# Altium PCB OpenRex_V1I1_PCB.PcbDoc (part 12 of 12)
Units mm, origin at the board's own origin, x right, y up, seen from the top; angles counter-clockwise.
Board outline 70 x 95 mm, 10 copper layers (L1, L2, L3, L4 (PWR), L5 (PWR), L6 (PWR), L7 (PWR), L8, L9, L10), stack 1.632 mm thick; 1080 components, 708 nets, 3831 pads, 2373 vias.
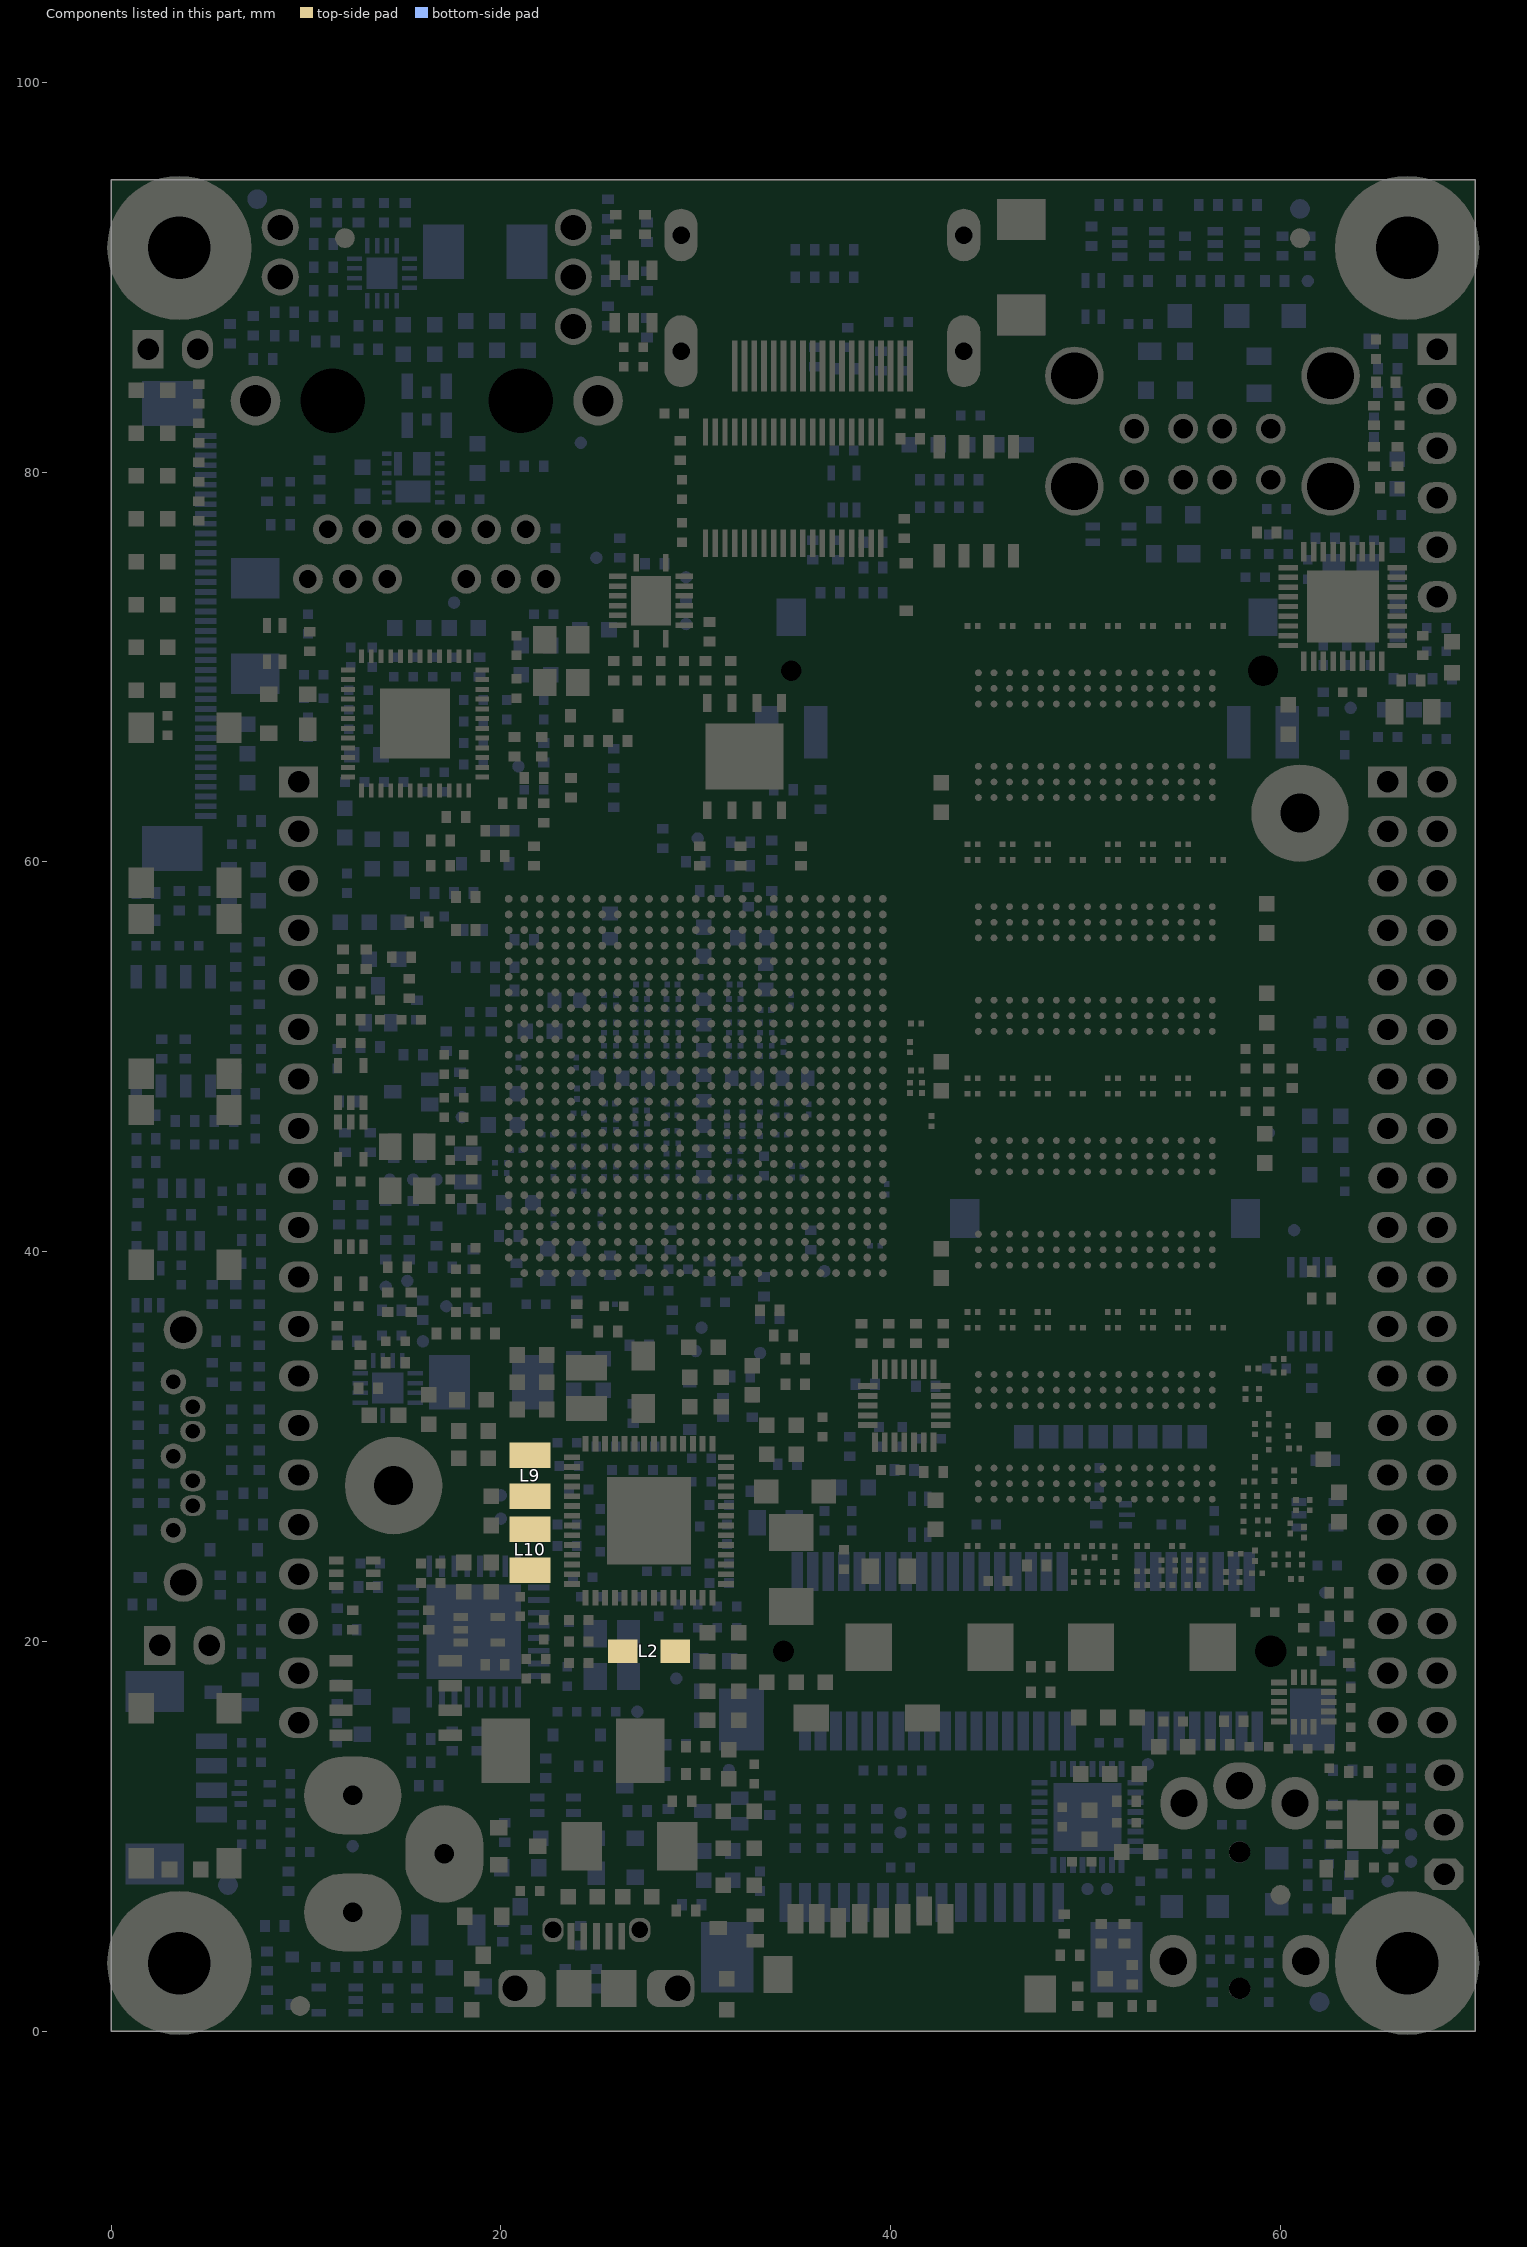
[diagram p20: the components of this part, seen from the top]

## Polygon pours and split planes (outlines as drawn) (continued)
GND on L10 "L10" (solid, remove dead copper, pour order 579): 23.6,30.5 24.1,30.5 24.3,30.3 24.5,30.3 25.2,30.3 25.2,29.7 25,29.5 24.7,29.2 24.25,28.75 23.7,28.75 23.7,29.4 23.6,29.5
+VIN_4V2 on L10 "L10" (solid, remove dead copper, pour order 578): 25.4,28.5 29.1,28.5 29.1,29 28.8,29 28.7,29.1 28.2,29.6 27.8,29.6 27.3,29.6 27.2,29.7 27.2,30.3 25.6,30.3 25.6,29.8 25.3,29.5 25.3,28.6
+3V3 on L10 "L10" (solid, remove dead copper, pour order 577): 38.2,29.8 38.2,29.2 37.9,29.2 37.8,29.1 37.8,27.5 36.9,27.5 36.9,29.8 38.2,29.8
+3V3_GYRO on L10 "L10" (solid, remove dead copper, pour order 576): 38.4,27.5 39.3,27.5 39.3,28 39.7,28.4 39.8,28.5 40.5,28.5 40.5,29.1 40.9,29.5 40.9,30.3 39.1,30.3 38.9,30.1 38.9,29.4 38.9,29.2 38.5,28.8 38.4,28.7
GND on L10 "L10" (solid, remove dead copper, pour order 575): 24.8,34.9 25.8,34.9 26.2,34.5 26.2,32.7 26,32.5 24.8,32.5
+1V375_SOC on L10 "L10" (solid, remove dead copper, pour order 574): 20.6,34.7 20.6,31.9 22.8,31.9 23.4,31.3 23.9,31.3 23.9,32.2 24.2,32.5 24.2,34.9 23.4,34.9 23.2,35.1 21,35.1 20.6,34.7
+VIN_4V2 on L10 "L10" (solid, remove dead copper, pour order 573): 15.4,32.3 14.9,31.8 14.9,31.6 14.7,31.6 14.4,31.6 14.3,31.5 14.3,30.8 14.4,30.7 15.3,30.7 16,31.4 16,32.3
PHASE_1V375 on L10 "L10" (solid, remove dead copper, pour order 572): 15.7,32.6 15.6,32.7 15.6,33.8 15.6,34 16.3,34.7 18.4,34.7 18.4,31.9 16.3,31.9 16.3,32.3 16,32.6 15.7,32.6 15.6,32.7
+VIN_5V on L10 "L10" (solid, remove dead copper, pour order 570): 19 vertices, not listed, extent 21.4,8.9 22.9,10.8
+3V3_MCU on L10 "L10" (solid, remove dead copper, pour order 569): 23.6,16.1 25.2,16.1 25.2,16.6 25,16.8 24.6,17.2 23.5,17.2 23.4,17.1 23.4,17 23.4,16.8 23.5,16.7 23.6,16.6
GND on L10 "L10" (solid, remove dead copper, pour order 568): 19.8,5.3 20.4,5.3 20.9,5.8 21.4,5.8 21.4,6.8 20.7,7.5 20.5,7.5 20,7 20,6.7 20,6.5 19.9,6.4 19.8,6.3 19.8,5.5
+V_INPUT on L10 "L10" (solid, remove dead copper, pour order 567): 16.3,4.4 16.3,6.5 16,6.8 15.4,6.8 15.1,6.5 15.1,4.4 16.3,4.4
GND on L10 "L10" (solid, remove dead copper, pour order 566): 21 vertices, not listed, extent 0.7,7.1 4.4,10.3
GND on L10 "L10" (solid, remove dead copper, pour order 565): 1.1,19.1 1.6,18.6 4,18.6 4.4,18.2 4.4,16.6 3.6,15.8 3.1,15.3 1.6,15.3 0.9,15.3 0.7,15.5 0.7,18.8 1,19.1
GND on L10 "L10" (solid, remove dead copper, pour order 564): 22 vertices, not listed, extent 0.4,59.2 5.2,62.4
SPLIT_R on L10 "L10" (solid, remove dead copper, pour order 563): 4.8,49.1 5.4,49.1 5.9,48.6 6.1,48.4 6.5,48.4 6.7,48.4 6.7,47.8 5.5,47.8 5.4,47.9 4.8,47.9 4.8,49.1
+3V3 on L10 "L10" (solid, remove dead copper, pour order 562): 7.2,58.4 8.2,58.4 8.5,58.1 8.5,57.7 7.7,56.9 7.5,56.9 7.2,57.2 7.1,57.3 7.1,58.4
+3V3_CSI1 on L10 "L10" (solid, remove dead copper, pour order 561): 4.8,63 4.8,62.2 5.3,62.2 5.4,62.1 5.6,61.9 5.6,59.3 5.6,57.6 6.5,57.6 6.5,61.3 6.2,61.6 6.2,62.2 6.2,62.4 5.6,63 4.8,63
GND on L10 "L10" (solid, remove dead copper, pour order 560): 6.9,61.2 7.5,61.2 8,60.7 8,59.1 7.5,58.6 7.1,58.6 7.1,59.8 7.1,60 7,60.1 6.9,60.2 6.9,61.2
GND on L10 "L10" (solid, remove dead copper, pour order 559): 28.9,39.4 28.9,37.7 28.3,37.7 28.3,38.3 27.8,38.8 27.8,39.3 27.9,39.4
GND on L10 "L10" (solid, remove dead copper, pour order 558): 19.6,42.9 20.5,42.9 20.5,42.2 20.8,41.9 20.9,41.8 20.9,41.6 20.8,41.5 19.9,41.5 19.6,41.8 19.6,42 19.6,42.9
+NVCC_CSI on L10 "L10" (solid, remove dead copper, pour order 557): 27 vertices, not listed, extent 29.5,39.2 32.7,43.5
+HDMI_VPH on L10 "L10" (solid, remove dead copper, pour order 556): 27 vertices, not listed, extent 28.7,39.2 31,44
+HDMI_VP on L10 "L10" (solid, remove dead copper, pour order 555): 29 vertices, not listed, extent 27.9,40.8 29,44
+NVCC_MIPI on L10 "L10" (solid, remove dead copper, pour order 554): 27.3,44 27.3,43.7 26.9,43.3 26.5,42.9 26.5,41.5 26.5,40.2 26.9,39.8 27.5,39.8 27.8,40.1 27.8,40.8 27.8,42.4 27.7,42.5 27.7,44
+2V5 on L10 "L10" (solid, remove dead copper, pour order 553): 35.6,40.4 36.8,40.4 37.7,39.5 37.7,39 37.6,38.9 37.4,38.7 36.5,38.7 35.6,39.6 35.6,40.4
GND on L10 "L10" (solid, remove dead copper, pour order 511): 45.4,94 48.2,94 48.6,93.6 48.6,92.3 48.2,91.9 45.4,91.9
PHASE_3V3_HDR on L10 "L10" (solid, remove dead copper, pour order 514): 15.35,89.85 18.1,89.85 18.1,92.7 16,92.7 15.4,92.1 15.3,92 15.3,90 15.3,89.9
+VIN_4V2 on L10 "L10" (solid, remove dead copper, pour order 515): 17 vertices, not listed, extent 14.05,86.8 17.6,89.55
GND on L10 "L10" (solid, remove dead copper, pour order 516): 14.6,86.5 15.4,86.5 15.6,86.3 15.8,86.3 16,86.3 16.2,86.5 17,86.5 17,85.6 16.7,85.3 15,85.3 14.9,85.3 14.6,85.6
GND on L10 "L10" (solid, remove dead copper, pour order 517): 19 vertices, not listed, extent 17.4,85.3 22.3,87
+3V3_HDR on L10 "L10" (solid, remove dead copper, pour order 518): 22 vertices, not listed, extent 17.8,87.3 22.4,92.7
GND on L10 "L10" (solid, remove dead copper, pour order 519): 25 vertices, not listed, extent 0.5,80.9 5.3,85.3
GND on L10 "L10" (solid, remove dead copper, pour order 520): 12,80.7 12,80.3 12.5,79.8 13.3,79.8 13.5,80 13.5,81.1 13.2,81.1 13.1,81.1 12.9,80.9 12.8,80.8 12.7,80.8 12.2,80.8 12,80.6
+3V3 on L10 "L10" (solid, remove dead copper, pour order 521): 11.5,80.8 11.6,80.7 11.6,80.5 11.5,80.4 11.4,80.3 10.5,80.3 10,80.3 9.8,80.5 9.8,80.7 10,80.9 10.3,80.9 11.4,80.9 11.5,80.8
+VIN_4V2 on L10 "L10" (solid, remove dead copper, pour order 522): 10.1,79.1 10.3,78.9 10.4,78.9 11.1,78.9 11.3,79.1 11.5,79.1 11.6,79 11.6,78.8 11.1,78.3 10.3,78.3 9.8,78.8 9.8,79 9.9,79.1
+VIN_ETH on L10 "L10" (solid, remove dead copper, pour order 523): 10.4,79.9 11.9,79.9 12.6,79.2 13.3,79.2 14,78.5 14,78.4 13.9,78.3 12.5,78.3 11.5,79.3 10.4,79.3
SW_EP on L10 "L10" (solid, remove dead copper, pour order 524): 13.9,81 13.9,81.1 15,81.1 15,79.8 14.5,79.8 14.4,79.7 14.4,79.4 14.4,79.3 13.9,79.3
+1V2_REG on L10 "L10" (solid, remove dead copper, pour order 525): 30 vertices, not listed, extent 15.5,78.3 20.5,81.1
+1V2_ETH on L10 "L10" (solid, remove dead copper, pour order 526): 20.9,80 21.5,80 21.5,80.6 21.8,80.9 21.8,81.1 21.7,81.2 20.7,81.2 20.6,81.1 20.6,80.9 20.9,80.6
+1V2_PMIC on L10 "L10" (solid, remove dead copper, pour order 527): 22,80 22,81.2 22.8,82 24.2,82 24.4,81.8 24.5,81.7 24.5,81.3 23.2,80
GND on L10 "L10" (solid, remove dead copper, pour order 528): 22.1,71.5 23.4,71.5 24.3,70.6 24.3,70.2 23.3,69.2 22.1,69.2
+1V2_ETH_AVDDL_PLL on L10 "L10" (solid, remove dead copper, pour order 529): 30 vertices, not listed, extent 18.8,66.9 22.5,70
GND on L10 "L10" (solid, remove dead copper, pour order 530): 9.8,67.1 10.4,67.1 10.9,67.6 10.9,67.8 10.7,68 10.3,68 10.2,68.1 10.2,68.7 9.6,68.7 9.6,67.3
+1V2_ETH_DVDDL on L10 "L10" (solid, remove dead copper, pour order 531): 44 vertices, not listed, extent 11.3,62.3 16.4,67.5
GND on L10 "L10" (solid, remove dead copper, pour order 532): 6.2,73.5 8.7,73.5 8.7,75.4 9.2,75.9 9.2,76.1 9.1,76.2 8,76.2 7.4,76.2 6.8,75.6 6.2,75.6
+5V_HDR_J1 on L10 "L10" (solid, remove dead copper, pour order 533): 22 vertices, not listed, extent 6.2,63.3 10.6,70.7
+5V on L10 "L10" (solid, remove dead copper, pour order 534): 7.3,68.1 7.5,68.1 8,67.6 8,67.2 7.4,66.6 6.9,66.6 6.6,66.6 6.6,67.4
+VIN_5V on L10 "L10" (solid, remove dead copper, pour order 535): 7.4,63.6 7.4,64.5 6.4,64.5 6,64.9 5.7,64.9 5.7,63.8 5.9,63.6
+3V3 on L10 "L10" (solid, remove dead copper, pour order 536): 14.3,56.5 15.2,56.5 15.2,57.9 13.8,57.9 13.8,57.6 13.9,57.5 14,57.4 14.2,57.4 14.3,57.3
+3V3_HDR on L10 "L10" (solid, remove dead copper, pour order 537): 11.1,55.9 12.1,55.9 12.2,56 12.2,57.3 11.3,57.3 11.1,57.1 11.1,55.9
+3V3_HDR_J1 on L10 "L10" (solid, remove dead copper, pour order 538): 19 vertices, not listed, extent 9.1,48.3 13.7,57.3
GND on L10 "L10" (solid, remove dead copper, pour order 539): 14.3,55.4 14.8,55.4 15.2,55.8 15.6,55.8 15.6,54.7 15,54.1 14.4,54.1 14.3,54.2 14.3,55.4
GND on L10 "L10" (solid, remove dead copper, pour order 540): 21.7,51.7 21.7,50.9 20.7,50.9 20.2,50.4 20.1,50.3 20,50.3 19.8,50.5 19.8,50.7 20.2,51.1 20.8,51.7 21.7,51.7
+1V375_CORE on L10 "Power plane" (solid, pour order 411): 21 vertices, not listed, extent 27.8,44.8 33,45.5
GND on L10 "Power plane" (solid, pour order 414): 23 vertices, not listed, extent 26.7,44.7 29.7,46.3
+1V2_VDD_ARM_CAP on L10 "Power plane" (solid, pour order 421): 29 vertices, not listed, extent 26.2,46.05 31.8,46.8
GND on L10 "Power plane" (solid, pour order 425): 23 vertices, not listed, extent 25.7,46.6 28.9,48.2
GND on L10 "Power plane" (solid, pour order 433): 27 vertices, not listed, extent 28.5,47.2 32.2,49.4
GND on L10 "Power plane" (solid, pour order 437): 31.2,47.3 32.6,47.3 33.5,47.3 33.5,47.2 33.5,46.3 32.9,46.3 32.1,46.3 32.1,46.7 31.9,46.9 31.6,46.9 31.4,46.9 31.2,47.1
+1V1_VDDSOC_CAP on L10 "Power plane" (solid, pour order 442): 19 vertices, not listed, extent 32.1,47.5 33.5,50.2
+1V375_CORE on L10 "Power plane" (solid, pour order 446): 23 vertices, not listed, extent 25.7,48.5 29.8,50.2
+1V2_VDD_ARM_CAP on L10 "Power plane" (solid, pour order 450): 26.2,48.1 26.2,48.2 26.3,48.3 26.4,48.3 27,48.3 27.1,48.4 27.1,49.3 27.3,49.3 27.9,49.3 27.9,48.5 28.1,48.3 28.1,48 28,47.9 27.7,47.6 26.7,47.6
GND on L10 "Power plane" (solid, pour order 453): 31 vertices, not listed, extent 24.7,50.3 29.8,51.4
GND on L10 "Power plane" (solid, pour order 455): 17 vertices, not listed, extent 31.1,50.3 35.4,50.9
+1V375_SOC on L10 "Power plane" (solid, pour order 456): 62 vertices, not listed, extent 23.7,50.6 33.5,53.3
+VDDPU on L10 "Power plane" (solid, pour order 458): 30 vertices, not listed, extent 25.7,51.4 30.8,52.8
GND on L10 "Power plane" (solid, pour order 459): 40 vertices, not listed, extent 24.6,52.6 30.8,53.9
GND on L10 "Power plane" (solid, pour order 462): 26 vertices, not listed, extent 34.5,45.8 36.1,49.3
GND on L10 "L10" (solid, remove dead copper, pour order 541): 25.3,48.5 25.3,49.3 24.3,49.3 24,49.6 23.7,49.6 23.7,48.2 24.1,48.2 24.2,48.2 24.5,48.5 25.3,48.5
+3V3 on L10 "L10" (solid, remove dead copper, pour order 542): 25 vertices, not listed, extent 22.3,49.6 25.5,51.9
+3V3 on L10 "L10" (solid, remove dead copper, pour order 543): 27 vertices, not listed, extent 27.3,53.55 30.8,55.55
GND on L10 "L10" (solid, remove dead copper, pour order 544): 32.95,53.55 32.95,54.2 33.15,54.4 34,54.4 34.05,54.45 34.05,56.5 33.25,56.5 33.25,55.75 32.9,55.4 32.45,54.95 32.45,53.9 32.45,53.75 32.65,53.55
+1V5_DDR on L10 "L10" (solid, remove dead copper, pour order 545): 21 vertices, not listed, extent 31.05,52.25 34,53.8
GND on L10 "L10" (solid, remove dead copper, pour order 546): 27 vertices, not listed, extent 31.1,51.6 35.1,53.3
+1V5_DDR on L10 "L10" (solid, remove dead copper, pour order 547): 34.75,52.8 34.25,52.3 34.25,51.9 34.25,51.6 34.05,51.4 33.75,51.4 33.75,51.05 34.45,51.05 34.6,51.2 34.9,51.5 34.9,52 34.9,52.3 35.05,52.45 35.05,52.8
+LVDS_2V5 on L10 "L10" (solid, remove dead copper, pour order 548): 25 vertices, not listed, extent 33.2,40.8 36.2,44.2
+1V5_DDR on L10 "L10" (solid, remove dead copper, pour order 549): 28 vertices, not listed, extent 33.7,44.2 35.1,50.4
GND on L10 "Power plane" (solid, pour order 409): 46 vertices, not listed, extent 25.7,42.6 33,45
GND on L10 "L10" (solid, remove dead copper, pour order 550): 25 vertices, not listed, extent 24.1,44.2 25.5,46.4
GND on L10 "L10" (solid, remove dead copper, pour order 551): 23.9,44 23.9,42.9 23.3,42.9 22.5,43.7 22.5,44 22.9,44 23.1,44.2 23.3,44.2 23.4,44.1 23.5,44 23.9,44
+1V1_NVCC_PLL_OUT on L10 "L10" (solid, remove dead copper, pour order 552): 21 vertices, not listed, extent 20.9,42.1 23.4,45
GND on L10 "L10" (solid, remove dead copper, pour order 397): 24.7,13.9 25.2,13.9 25.5,14.2 26.8,14.2 26.8,13.5 26,13.5 25.8,13.3 25.1,12.6 24.6,12.6 24.5,12.6 24.4,12.7 24.4,12.9 24.4,13 24.7,13.3
GND on L10 "L10" (solid, remove dead copper, pour order 400): 26.4,10.3 26.4,9.5 26.7,9.2 27.2,8.7 27.7,8.7 27.8,8.8 27.8,10.3 27.6,10.5 26.6,10.5 26.4,10.3
GND on L10 "L10" (solid, remove dead copper, pour order 319): 48.5,24.6 49.5,24.6 49.6,24.5 49.6,24.2 49.2,23.8 49.1,23.7 49.1,23.5 48.5,23.5
GND on L2 (split plane): 69.898,0.102 0.102,0.102 0.102,94.898 69.898,94.898
GND on L9 (split plane): 69.898,0.102 0.102,0.102 0.102,94.898 69.898,94.898

## Other copper
L10:
  rectangle net PWM2_OUT_R: 61.7,50.3 62.35,50.95
  region net UART4_TXD: 63.5,50.95 62.85,50.95 62.85,50.3 63.5,50.3
  region net UART4_TXD_R: 62.85,52.1 62.85,51.45 63.5,51.45 63.5,52.1
  region net GPIO_OR_PWM_2: 61.7,52.1 61.7,51.45 62.35,51.45 62.35,52.1
  region: 1344 vertices and 0 holes, not listed, extent 31.797,93.426 33.878,94.403
  region: 1381 vertices and 0 holes, not listed, extent 32.34,91.702 33.939,93.239
  region: 2099 vertices and 0 holes, not listed, extent 30.813,91.665 32.707,94.4

## Silkscreen, mask and mechanical layers (free items; w line width, h text height)
Top Overlay:
  text ".VersionRevision" at 52.7,77.2 h2.5 r180
  text "5" at 4.7,75.9 h2.2 r270
  text ".Project" at 57,74.8 h3.35 r180
  text "6" at 4.7,73.7 h2.2 r270
  text "7" at 4.7,71.5 h2.2 r270
  text "8" at 4.7,69.3 h2.2 r270
  text "+" at 3.1,57.8 h3
  text "(c) 2016" at 61.8,52 h2.2 r90
  text "-" at 3,49.6 h3.5 r270
  text "FEDEVEL Academy" at 63.5,41 h2.2 r90
  text "H" at 3,39.9 h2.5 r270
  text "R" at 3,17.5 h2.5 r270
Bottom Overlay:
  lines w0.254: 26.644,77.999 26.644,80.499 ; 29.644,77.999 29.644,80.499 ; 32.644,77.999 32.644,80.499 ; 23.644,77.999 35.644,77.999 35.644,80.499 23.644,80.499 23.644,77.999
  text "MODBOX" at 35.6,81.5 h2.3
  text "D" at 25.944,78.499 h2.5
  text "C" at 28.944,78.499 h2.5
  text "B" at 31.944,78.499 h2.5
  text "A" at 34.944,78.499 h2.5
  text "Learn Schematic" at 55.8,68 h2.5
  text "and PCB Design" at 55.6,65.4 h2.5
  text "ONLINE at" at 52.4,62.8 h2.5
  text "FEDEVEL Academy" at 57.3,60.2 h2.5
  text "Do you want to learn how to" at 59.8,55 h2
  text "design boards like this?" at 58.2,52.7 h2
  text "Go to: fedevel.com/academy" at 60.2,50.4 h2
Bottom Paste:
  rectangle: 61.7,51.45 62.35,52.1
  rectangle: 62.85,51.45 63.5,52.1
  rectangle: 62.85,50.3 63.5,50.95
  rectangle: 61.7,50.3 62.35,50.95
Bottom Solder:
  drawing of 7 lines, arcs and shapes, not listed
Manufacturing Notes:
  circle w1: c176.75,149.25 r0.25
  circle w1: c176.75,108.25 r0.25
  circle w1: c260.75,108.25 r0.25
  circle w1: c260.75,149.25 r0.25
  lines w0.2: 142.5,102.5 178.75,102.5 ; 142.5,105 178.75,105 ; 142.5,152.5 178.75,152.5 ; 142.5,155 178.75,155 ; 144,101.5 145,102.5 146,101.5 ; 144,106 145,105 146,106 ; 144,151.5 145,152.5 146,151.5 ; 144,156 145,155 146,156 ; 145,95 145,162.5 ; 163.75,128.75 165,128.75 ; 175,108.75 176.25,108.75 ; 175,148.75 176.25,148.75 ; 176.25,110 176.25,108.75 ; 176.25,147.5 176.25,148.75 ; 180,108.75 180,110 ; 180,152.5 180,164 ; 181,161.5 180,162.5 ; 181,163.5 180,162.5 ; 181.25,110 180,110 ; 197.5,91 197.5,92.5 ; 213.75,102.5 213.75,103.75 ; 213.75,110 215,110 ; 213.75,155 213.75,153.75 ; 214,161.5 215,162.5 ; 214,163.5 215,162.5 ; 215,102.5 227.5,102.5 ; 215,103.75 213.75,103.75 ; 215,105 227.5,105 ; 215,108.75 215,110 ; 215,153.75 213.75,153.75 ; 215,155 227.5,155 ; 215,164 215,152.5 227.5,152.5 ; 218.75,93.75 218.75,98.75 ; 218.75,163.75 218.75,158.75 ; 222.5,103.75 223.75,103.75 ; 222.5,108.75 222.5,110 ; 222.5,152.5 222.5,164 ; 222.5,153.75 223.75,153.75 ; 223.5,161.5 222.5,162.5 ; 223.5,163.5 222.5,162.5 ; 223.75,102.5 223.75,103.75 ; 223.75,110 222.5,110 ; 223.75,155 223.75,153.75 ; 240,91 240,92.5 ; 256.25,110 257.5,110 ; 256.5,161.5 257.5,162.5 ; 256.5,163.5 257.5,162.5 ; 257.5,108.75 257.5,110 ; 257.5,152.5 257.5,164 ; 261.25,110 261.25,108.75 ; 261.25,147.5 261.25,148.75 ; 262.5,108.75 261.25,108.75 ; 262.5,148.75 261.25,148.75 ; 282.5,128.75 281.25,128.75 ; 165,128.75 167,126.75 ; 165,128.75 167,130.75 167,139.5 176.25,148.75 ; 167,126.75 167,118 176.25,108.75 ; 167,126.75 167,126.75 ; 180,110 197.5,92.5 ; 180,162.5 215,162.5 ; 197.5,92.5 215,110 ; 213.75,103.75 218.75,98.75 ; 213.75,153.75 218.75,158.75 ; 218.75,98.75 223.75,103.75 ; 218.75,158.75 223.75,153.75 ; 222.5,110 240,92.5 ; 222.5,162.5 257.5,162.5 ; 240,92.5 257.5,110 ; 261.25,108.75 281.25,128.75 ; 261.25,148.75 281.25,128.75
  lines w0.254: -6.5,-82 86,-82 ; -6.5,-81.925 -6.5,-71.925 ; -6.5,-62 86,-62 ; 33.5,-72 33.5,-62 ; 68.5,-62 68.5,-54.5 ; 86,-81.925 86,-71.925 ; -6.5,-72 -6.5,-54.5 86,-54.5 86,-72 -6.5,-72
  lines w0.4: 142.524,54.2 291.976,54.2 ; 142.524,61.16 291.976,61.16 ; 291,70.5 143.25,70.5 ccw(c143.25,68.25) 141,68.25 141,-34.75 ccw(c143.25,-34.75) 143.25,-37 291.25,-37 ccw(c291.25,-34.75) 293.5,-34.75 293.5,68.25 ccw(c291.25,68.25) 291.25,70.5
  lines w0.5: 180,100 180,102.5 ; 180,105 180,152.5 ; 180,155 180,157.5 ; 215,100 215,102.5 ; 215,105 215,152.5 ; 215,155 215,157.5 ; 216.096,102.5 ccw(c216.096,103.75) 216.096,105 ; 216.096,152.5 ccw(c216.096,153.75) 216.096,155 ; 216.25,102.5 178.75,102.5 cw(c178.75,103.75) 178.75,105 216.25,105 ; 216.25,152.5 178.75,152.5 cw(c178.75,153.75) 178.75,155 216.25,155 ; 221.25,102.5 258.75,102.5 ccw(c258.75,103.75) 258.75,105 221.25,105 ; 221.25,152.5 258.75,152.5 ccw(c258.75,153.75) 258.75,155 221.25,155 ; 221.404,102.5 cw(c221.404,103.75) 221.404,105 ; 221.404,152.5 cw(c221.404,153.75) 221.404,155 ; 222.5,100 222.5,102.5 ; 222.5,105 222.5,152.5 ; 222.5,155 222.5,157.5 ; 257.5,100 257.5,102.5 ; 257.5,105 257.5,152.5 ; 257.5,155 257.5,157.5 ; 263.75,100 173.75,100 173.75,157.5 263.75,157.5 263.75,100.154
  text "Board info" at 141,258 h1.52
  text "Minimum Track: 100um" at 141,255.5 h1.52
  text "Minimum Gap: 100um" at 141,253 h1.52
  text "Minimum Through Hole VIA: 0.45mm (pad) / 0.2mm (drill). Drilling: L1-L10" at 141,250.5 h1.52
  text "1. REMOVE ALL NON-FUNCTIONAL INNER LAYER PADS." at 141,245.5 h1.52
  text "2. THIS BOARD CONTAINS IMPEDANCE CONTROLLED TRACKS, TRACK AND GAP SIZES ARE AS FOLLOWS:" at 141,240.5 h1.52
  text "TYPE;" at 146,235.5 h1.52
  text "Impedance;" at 158.5,235.5 h1.52
  text "Layer (Reference);" at 181,235.5 h1.52
  text "Width (um);" at 216,235.5 h1.52
  text "Gap (um);" at 236,235.5 h1.52
  text "DIFF;" at 146,230.5 h1.52
  text "90ohm;" at 158.5,230.5 h1.52
  text "L1(L2), L10(L9);" at 181,230.5 h1.52
  text "114" at 216,230.5 h1.52
  text "160" at 236,230.5 h1.52
  text "DIFF;" at 146,228 h1.52
  text "90ohm;" at 158.5,228 h1.52
  text "L3(L2,L4), L8(L9,L7);" at 181,228 h1.52
  text "130" at 216,228 h1.52
  text "190" at 236,228 h1.52
  text "DIFF;" at 146,223 h1.52
  text "100ohm;" at 158.5,223 h1.52
  text "L1(L2), L10(L9);" at 181,223 h1.52
  text "100" at 216,223 h1.52
  text "220" at 236,223 h1.52
  text "DIFF;" at 146,220.5 h1.52
  text "100ohm;" at 158.5,220.5 h1.52
  text "L3(L2,L4), L8(L9,L7);" at 181,220.5 h1.52
  text "110" at 216,220.5 h1.52
  text "210" at 236,220.5 h1.52
  text "SE;" at 146,215.5 h1.52
  text "50ohm;" at 158.5,215.5 h1.52
  text "L1(L2), L10(L9);" at 181,215.5 h1.52
  text "114" at 216,215.5 h1.52
  text "SE;" at 146,213 h1.52
  text "50ohm;" at 158.5,213 h1.52
  text "L3(L2,L4), L8(L9,L7);" at 181,213 h1.52
  text "120" at 216,213 h1.52
  text "3. FINISHED PANEL THICKNESS IS NOT CRITICAL: TO BE APPROXIMATELY 1.6mm" at 141,208 h1.52
  text "4. BOARD FINISH: IMMERSION Au/ELECTROLESS Ni; 0.05-0.12 um GOLD; 3-6um NICKEL" at 141,203 h1.52
  text "5. SOLDER RESIST: APPLY TO BOTH SIDES COLOUR - NAVY BLUE" at 141,198 h1.52
  text "6. COMPONENT IDENT: COLOUR TO BE WHITE" at 141,193 h1.52
  text "7. PANELIZE THE BOARD (2PCS PER PANEL). PLACE FIDUCIALS ON THE PANEL STRIPS AS FOLLOWS:" at 141,188 h1.52
  text "- FIDUCIAL DIAMTER 1-1.5MM, SOLDER MASK OPENING AT LEAST 1MM GREATER THAN FIDUCIAL" at 146,185.5 h1.52
  text "- MINIMUM 4MM DISTANCE FROM THE PANEL EDGE" at 146,183 h1.52
  text "- 3 FIDUCIALS SHOULD LIE ON TWO LINES THAT INTERSECT AT A RIGHT ANGLE" at 146,180.5 h1.52
  text "- PLACE ONE FIDUCIAL INTO EACH PANEL CORNER (FOUR ON THE TOP AND FOUR ON THE BOTTOM LAYER)" at 146,178 h1.52
  text "PANEL DRAWING (NOT IN SCALE):" at 145.254,172.754 h1.52
  text "- NOT SPECIFIED DIMENSIONS ARE NOT CRITICAL. CAN BE CHOSEN BY PCB MANUFACTURER" at 145.254,170.254 h1.52
  text "CUT-OUT" at 214.004,165.254 h1.52
  text "70mm" at 194.75,163.75 h1.52
  text "70mm" at 237.25,163.75 h1.52
  text "5mm" at 143.75,157.5 h1.52 r90
  text "Files" at -4,150.5 h1.52
  text "*.GTO - Top Overlay" at -4,148 h1.52
  text "*.GTP - Top Paste" at -4,145.5 h1.52
  text "*.GTS - Top Solder" at -4,143 h1.52
  text "*.GTL - L1 (Positive)" at -4,140.5 h1.52
  text "*.GP1 - L2 (Negative)" at -4,138 h1.52
  text "*.G1 - L3 (Positive)" at -4,135.5 h1.52
  text "*.G2 - L4 (PWR) (Positive)" at -4,133 h1.52
  text "*.G3 - L5 (PWR) (Positive)" at -4,130.5 h1.52
  text "FIDUCIALS" at 148.354,128.404 h1.52
  text "*.G4 - L6 (PWR) (Positive)" at -4,128 h1.52
  text "FIDUCIALS" at 285.354,127.654 h1.52
  text "PCB" at 190,127.5 h5.08
  text "PCB" at 232.5,127.5 h5.08
  text "95mm" at 143.75,126.25 h1.52 r90
  text "*.G5 - L7 (PWR) (Positive)" at -4,125.5 h1.52
  text "*.G6 - L8 (Positive)" at -4,123 h1.52
  text "*.GP2 - L9 (Negative)" at -4,120.5 h1.52
  text "*.GBL - L10 (Positive)" at -4,118 h1.52
  text "*.GBS - Bottom Solder" at -4,115.5 h1.52
  text "*.GBP - Bottom Paste" at -4,113 h1.52
  text "*.GBO - Bottom Overlay" at -4,110.5 h1.52
  text "*.GM3 - Manufacturing Notes" at -4,108 h1.52
  text "*.GM4 - License" at -4,105.5 h1.52
  text "*.GM6 - Mechanical Drawing" at -4,103 h1.52
  text "*.GM28 - Board Outline" at -4,100.5 h1.52
  text "5mm" at 143.75,96.25 h1.52 r90
  text "CUT-OUT" at 213.75,91.25 h1.52
  text "V-CUT" at 194.104,87.654 h1.52
  text "V-CUT" at 236.604,87.654 h1.52
  text "Layer Stack Up Detail for: OpenRex V1I1_PCB.PcbDoc" at 142.524,64.75 h1.6
  text "Layer" at 142.524,58.56 h1.6
  text "Gerber" at 187.629,58.56 h1.6
  text "Copper" at 210.818,58.56 h1.6
  text "Dielectric" at 234.119,58.56 h1.6
  text "Dielectric" at 261.619,58.56 h1.6
  text "Name" at 142.524,55.36 h1.6
  text "Document" at 187.629,55.36 h1.6
  text "Thickness" at 210.818,55.36 h1.6
  text "Height" at 234.119,55.36 h1.6
  text "Constant" at 261.619,55.36 h1.6
  text "Top Solder Mask" at 142.524,50.193 h2.25
  text "(.GTS)" at 187.629,50.193 h2.25
  text "43um" at 212.629,42.693 h2.25
  text "L1" at 142.524,42.578 h2.25
  text "(.GTL)" at 187.629,42.578 h2.25
  text "74um" at 235.129,38.943 h2.25
  text "3.95" at 262.629,38.943 h2.25
  text "18um" at 212.629,35.193 h2.25
  text "L2" at 142.524,34.963 h2.25
  text "(.GP1)" at 187.629,34.963 h2.25
  text "102um" at 235.129,31.443 h2.25
  text "4.12" at 262.629,31.443 h2.25
  text "18um" at 212.629,27.693 h2.25
  text "L3" at 142.524,27.348 h2.25
  text "(.G1)" at 187.629,27.348 h2.25
  text "282um" at 235.129,23.943 h2.25
  text "4.06" at 262.629,23.943 h2.25
  text "18um" at 212.629,20.193 h2.25
  text "L4 (PWR)" at 142.524,19.733 h2.25
  text "(.G2)" at 187.629,19.733 h2.25
  text "102um" at 235.129,16.443 h2.25
  text "4.12" at 262.629,16.443 h2.25
  text "18um" at 212.629,12.693 h2.25
  text "L5 (PWR)" at 142.524,12.233 h2.25
  text "(.G3)" at 187.629,12.233 h2.25
  text "282um" at 235.129,8.943 h2.25
  text "4.06" at 262.629,8.943 h2.25
  text "18um" at 212.629,5.193 h2.25
  text "L6 (PWR)" at 142.524,4.733 h2.25
  text "(.G4)" at 187.629,4.733 h2.25
  text "102um" at 235.129,1.443 h2.25
  text "4.12" at 262.629,1.443 h2.25
  text "18um" at 212.629,-2.307 h2.25
  text "L7 (PWR)" at 142.524,-2.652 h2.25
  text "(.G5)" at 187.629,-2.652 h2.25
  text "282um" at 235.129,-6.057 h2.25
  text "4.06" at 262.629,-6.057 h2.25
  text "18um" at 212.629,-9.807 h2.25
  text "L8" at 142.524,-10.267 h2.25
  text "(.G6)" at 187.629,-10.267 h2.25
  text "102um" at 235.129,-13.557 h2.25
  text "4.12" at 262.629,-13.557 h2.25
  text "18um" at 212.629,-17.307 h2.25
  text "L9" at 142.524,-17.882 h2.25
  text "(.GP2)" at 187.629,-17.882 h2.25
  text "74um" at 235.129,-21.057 h2.25
  text "3.95" at 262.629,-21.057 h2.25
  text "43um" at 212.9,-24.6 h2.25
  text "L10" at 142.524,-25.497 h2.25
  text "(.GBL)" at 187.629,-25.497 h2.25
  text "Bottom Solder Mask" at 142.524,-33.112 h2.25
  text "(.GBS)" at 187.629,-33.112 h2.25
  text "OpenRex" at -3.5,-59.5 h3
  text ".VersionRevision" at 71,-59.5 h3
  text "Copyright 2016" at -1.5,-67 h1.52
  text "Designed by FEDEVEL" at 38.5,-67 h1.52
  text "FEDEVEL" at -1.5,-69.5 h1.52
  text "www.fedevel.com" at 38.5,-69.5 h1.52
  text "Contact:" at -1.5,-77 h1.52
  text "robert.feranec@fedevel.com" at 13.5,-77 h1.52
License:
  text "LICENSE" at -9,280.5 h1.52
  text "OpenRex is a registered trademark of FEDEVEL." at -9,275.5 h1.52
  text "This project is developed under Creative Commons Attribution 4.0 International license." at -9,270.5 h1.52
  text "There is one exception:" at -9,268 h1.52
  text "Using this project (in whole or in part) or its modifications for any commercial" at -9,263 h1.52
  text "educational activities (e.g. paid courses, trainings, videos, ....)  without express" at -9,260.5 h1.52
  text "written permission of FEDEVEL is prohibited. Universities can use this project" at -9,258 h1.52
  text "with no limitations." at -9,255.5 h1.52
  text "Why this exception?" at -9,250.5 h1.52
  text "The income from FEDEVEL courses covers development of open source boards like this." at -9,248 h1.52
  text "Creative Commons Attribution 4.0 International license" at -9,243 h1.52
  text "ORIGINAL AUTHOR: FEDEVEL 2016" at -9,238 h1.52
  text "WEBSITE: http://www.iMX6Rex.com" at -9,235.5 h1.52
  text "This is a human-readable summary of (and not a substitute for) the Legal Code" at -9,230.5 h1.52
  text "(read full license at: http://creativecommons.org/licenses/by/4.0/legalcode)." at -9,228 h1.52
  text "You are free:" at -9,223 h1.52
  text "Share - copy and redistribute the material in any medium or format" at -9,220.5 h1.52
  text "Adapt - remix, transform, and build upon the material for any purpose, even commercially." at -9,218 h1.52
  text "The licensor cannot revoke these freedoms as long as you follow the license terms." at -9,213 h1.52
  text "Under the following conditions:" at -9,208 h1.52
  text "Attribution - You must give appropriate credit, provide a link to the license," at -9,205.5 h1.52
  text "and indicate if changes were made. You may do so in any reasonable manner," at -9,203 h1.52
  text "but not in any way that suggests the licensor endorses you or your use." at -9,200.5 h1.52
  text "No additional restrictions - You may not apply legal terms or technological measures" at -9,198 h1.52
  text "that legally restrict others from doing anything the license permits." at -9,195.5 h1.52
  text "Notices:" at -9,190.5 h1.52
  text "You do not have to comply with the license for elements of the material in the public" at -9,188 h1.52
  text "domain or where your use is permitted by an applicable exception or limitation." at -9,185.5 h1.52
  text "No warranties are given. The license may not give you all of the permissions" at -9,180.5 h1.52
  text "necessary for your intended use. For example, other rights such as publicity, privacy," at -9,178 h1.52
  text "or moral rights may limit how you use the material." at -9,175.5 h1.52
Mechanical Drawing:
  circle w2.8: c11.374,83.657 r0.25
  circle w2.8: c21.026,83.657 r0.25
  circle w0.6: c57.9,2.2 r0.25
  circle w0.6: c57.9,9.2 r0.25
  circle w0.6: c34.5,19.5 r0.25
  circle w0.8: c59.5,19.5 r0.4
  circle w0.8: c59.1,69.8 r0.375
  circle w0.6: c34.9,69.8 r0.225
  circle w0.6: c61,62.5 r1
  circle w1: c66.5,91.5 r1.6
  circle w0.6: c14.5,28 r1
  circle w1: c3.5,91.5 r1.6
  circle w1: c3.5,3.5 r1.6
  circle w1: c66.5,3.5 r1.6
  lines w0.254: 3.3,12.6 4.3,12.6 ; 3.3,43.3 4.3,43.3 ; 3.3,53.1 4.3,53.1 ; 3.3,62.9 4.3,62.9 ; 3.8,12.1 3.8,13.1 ; 3.8,42.8 3.8,43.8 ; 3.8,52.6 3.8,53.6 ; 3.8,62.4 3.8,63.4 ; 4.4,72.1 4.85,72.1 ; 4.6,13 5.15,13 ; 16.2,76.353 16.2,77.684 ; 36.5,83.5 36.5,84.07 ; 56,79 56,80.1
  lines w1: 0,0 70,0 70,95 0,95 0,0 ; 11.5,23 11.5,72 63.5,72 63.5,23 11.5,23
  text "Mechanical Drawing" at 6.5,165.5 h3.5
  text "of OpenRex" at 11.5,155.5 h3.5
  text ".VersionRevision" at 49,155.5 h3.5
  text "Suggested heatsink dimensions" at 25,74 h1.5
  text "(Scale 1:1)" at 27.5,-57.5 h1.52
Board Outline:
  the board outline again, w0.2
ASM Top:
  lines w0.01: 106.9,50 106.9,50.05
  lines w0.2: -22,32.5 -7,32.5 ; -19.5,32.5 -19.5,37.5 -16.5,37.5 -16.5,32.5 ; -18.5,32.5 -18.5,28.5 -17.5,28.5 -17.5,32.5
  text "Assembly TOP of OpenRex" at 16,102 h1.52
  text ".VersionRevision" at 52.3,102 h1.52
  text ".VariantName" at 27.5,98 h1.52
  text "IMPORTANT:" at -22,45 h1.5
  text "PLACE J1 PLASTIC" at -22,42.5 h1
  text "SIDE ON THE TOP" at -22,40 h1
  text "TOP" at -11.55,33.5 h1
  text "BOTTOM" at -14.75,29.5 h1
ASM Bottom:
  rectangle: -17.7,64.3 -13.6,66.3
  rectangle: -17.7,60.3 -13.6,62.3
  rectangle: -15.6,89.3 -13.6,90.3
  rectangle: -15.6,85.3 -13.6,86.3
  region: -15.6,73.8 -17.6,73.8 -17.6,72.8 -15.6,72.8
  region: -15.6,77.8 -17.6,77.8 -17.6,76.8 -15.6,76.8
  lines w0.01: -36.9,50 -36.9,50.05
  lines w0.2: 77.4,33 92.5,33 ; 87.5,33 87.5,28 90.5,28 90.5,33 ; 88.5,33 88.5,37 89.5,37 89.5,33 ; -35,57.5 -35,97.5 -7.5,97.5 -7.5,57.5 -35,57.5 ; -19.1,59.4 -19.1,63.2 -12.3,63.2 -12.3,59.4 -19.1,59.4 ; -19.1,63.4 -19.1,67.2 -12.3,67.2 -12.3,63.4 -19.1,63.4 ; -19.1,71.9 -19.1,75.7 -12.3,75.7 -12.3,71.9 -19.1,71.9 ; -19.1,75.9 -19.1,79.7 -12.3,79.7 -12.3,75.9 -19.1,75.9 ; -19.1,84.4 -12.3,84.4 -12.3,88.2 -19.1,88.2 -19.1,84.4 ; -19.1,88.4 -12.3,88.4 -12.3,92.2 -19.1,92.2 -19.1,88.4 ; -18.4,60 -18.4,62.6 -16.9,62.6 -16.9,60 -18.4,60 ; -18.4,64 -18.4,66.6 -16.9,66.6 -16.9,64 -18.4,64 ; -18.4,72.5 -16.9,72.5 -16.9,75.1 -18.4,75.1 -18.4,72.5 ; -18.4,76.5 -18.4,79.1 -16.9,79.1 -16.9,76.5 -18.4,76.5 ; -18.4,85 -18.4,87.6 -16.9,87.6 -16.9,85 -18.4,85 ; -18.4,89 -16.9,89 -16.9,91.6 -18.4,91.6 -18.4,89 ; -16.4,60 -16.4,61.7 -14.9,61.7 -14.9,60 -16.4,60 ; -16.4,64 -16.4,65.7 -14.9,65.7 -14.9,64 -16.4,64 ; -16.4,72.5 -14.9,72.5 -14.9,74.2 -16.4,74.2 -16.4,72.5 ; -16.4,76.5 -16.4,78.2 -14.9,78.2 -14.9,76.5 -16.4,76.5 ; -16.4,85 -16.4,86.7 -14.9,86.7 -14.9,85 -16.4,85 ; -16.4,89 -14.9,89 -14.9,90.7 -16.4,90.7 -16.4,89 ; -14.4,60 -14.4,62.6 -12.9,62.6 -12.9,60 -14.4,60 ; -14.4,64 -12.9,64 -12.9,66.6 -14.4,66.6 -14.4,64 ; -14.4,72.5 -14.4,75.1 -12.9,75.1 -12.9,72.5 -14.4,72.5 ; -14.4,76.5 -12.9,76.5 -12.9,79.1 -14.4,79.1 -14.4,76.5 ; -14.4,85 -12.9,85 -12.9,87.6 -14.4,87.6 -14.4,85 ; -14.4,89 -14.4,91.6 -12.9,91.6 -12.9,89 -14.4,89
  text ".VersionRevision" at 14.5,102 h1.52
  text "Assembly BOTTOM of OpenRex" at 55.2,102 h1.52
  text ".VariantName" at 43.5,98 h1.52
  text "FITTING OPTION 1" at -9.9,93.8 h1
  text "FIT 2X 0402" at -22.5,87.5 h1
  text "FITTING OPTION 2" at -9.9,81.3 h1
  text "FIT 2X 0402" at -22.5,75 h1
  text "FITTING OPTION 3" at -9.9,68.8 h1
  text "FIT 2X 0805" at -22.5,62.5 h1
  text "IMPORTANT:" at 94,45 h1.5
  text "PLACE J2 PLASTIC" at 94,42.5 h1
  text "SIDE ON THE BOTTOM" at 94,40 h1
  text "TOP" at 86.35,34 h1
  text "BOTTOM" at 86.25,30 h1

## Dimensions
34.5,19.5 to 0,0 on Mechanical Drawing
4.85,72.1 to 0,0 on Mechanical Drawing
41.6,6.6 to 0,0 on Mechanical Drawing
5.15,13 to 0,0 on Mechanical Drawing
68.04,86.3 to 70,0 on Mechanical Drawing
1.9,86.3 to 0,95 on Mechanical Drawing
34.5,19.5 to 34.9,69.8 on Mechanical Drawing
70,0 to 70,95 on Mechanical Drawing
3.5,3.5 to 3.5,91.5 on Mechanical Drawing
66.5,3.5 to 70,0 on Mechanical Drawing
3.5,3.5 to 66.5,3.5 on Mechanical Drawing
3.5,91.5 to 0,95 on Mechanical Drawing
1.9,86.3 to 0,0 on Mechanical Drawing
65.5,64.1 to 0,0 on Mechanical Drawing
14.5,28 to 61,62.5 on Mechanical Drawing
4.3,62.9 to 0,0 on Mechanical Drawing
4.3,53.1 to 0,0 on Mechanical Drawing
4.3,43.3 to 0,0 on Mechanical Drawing
4.3,12.6 to 0,0 on Mechanical Drawing
3.8,63.4 to 0,95 on Mechanical Drawing
16.2,76.353 to 0,95 on Mechanical Drawing
2.5,19.8 to 0,0 on Mechanical Drawing
3.2,29.51 to 0,0 on Mechanical Drawing
14.5,28 to 70,0 on Mechanical Drawing
34.5,19.5 to 70,0 on Mechanical Drawing
68.4,8.06 to 70,0 on Mechanical Drawing
59.1,69.8 to 34.9,69.8 on Mechanical Drawing
34.9,69.8 to 0,95 on Mechanical Drawing
2.5,19.78 to 0,0 on Mechanical Drawing
68.04,86.3 to 0,95 on Mechanical Drawing
65.5,64.1 to 9.62,64.1 on Mechanical Drawing
9.62,64.1 to 0,95 on Mechanical Drawing
56,79 to 0,95 on Mechanical Drawing
36.5,83.5 to 0,95 on Mechanical Drawing
70,95 to 0,95 on Mechanical Drawing
14.5,28 to 0,0 on Mechanical Drawing
61,62.5 to 14.5,28 on Mechanical Drawing
59.5,19.5 to 0,0 on Mechanical Drawing
68.4,8.06 to 0,0 on Mechanical Drawing
57.9,12.6 to 0,0 on Mechanical Drawing
39.55,2.1 to 0,0 on Mechanical Drawing
24.9,2.65 to 0,0 on Mechanical Drawing
12.4,12.1 to 0,0 on Mechanical Drawing
61,62.5 to 56.57,58.07 on Mechanical Drawing
3.5,3.5 to 9.147,9.147 on Mechanical Drawing
8.4,38.9 to -5.8,40.8 on Mechanical 16
66.5,91.5 to 63.867,88.867 on Mechanical Drawing
3.5,91.5 to 7,89 on Mechanical Drawing
66.5,3.5 to 61.608,8.392 on Mechanical Drawing
14.5,28 to 16.702,25.798 on Mechanical Drawing
68.66,40.1 to 76.9,42.4 on Mechanical 16
0,95 to 11.5,23 on Mechanical Drawing
11.5,72 to 63.5,72 on Mechanical Drawing
70,0 to 63.5,23 on Mechanical Drawing
63.5,23 to 63.5,72 on Mechanical Drawing
13.7,83.4 to 7.8,83.4 on Mechanical 16

## Text inside footprints (layer, text, board x,y; h text height)
J1: Top Overlay "1" at 7.5,63.7 h1.02; Bottom Overlay "1" at 8.8,66.3 h1.02
J2: Top Overlay "1" at 63.5,63.69 h1.02; Bottom Overlay "1" at 63.85,63.6 h1.02
J3: Top Overlay "1" at 65.9,85.9 h1.02
J5: Mechanical 1 "go over the board edge" at 7,88.1 h0.5 r90; Mechanical 1 "NOTE: Bottom plastic may" at 6.1,88.1 h0.5 r90
J7: Bottom Overlay "1" at 5.3,60.7 h1.02
J12: Bottom Overlay "1" at 46.2,8 h1.02 r270
J13: Top Overlay "KEEP OUT" at 42.775,12.575 h1 r180
J15: Bottom Overlay "1" at 59.2,13.6 h1.02 r270
JP1: Top Overlay "1" at 1.4,18.1 h1.02 r270
JP2: Top Overlay "1" at 0.3,88.2 h1.02 r270
Q7: Top Overlay "1" at 13.1,19.2 h1.02 r270
U17: Top Overlay "1" at 42.3,77 h1.02
U19: Bottom Overlay "1" at 1.1,52.8 h1.02 r180